# Altium PCB PCB4270Y_A00.PcbDoc (part 2 of 4)
Units mil, origin at the board's own origin, x right, y up, seen from the top; angles counter-clockwise.
Board outline 3622.05 x 2007.87 mil, 4 copper layers (Top Layer, Signal Layer 2, Signal Layer 3, Bottom Layer), stack 62.992 mil thick; 126 components, 105 nets, 457 pads, 1130 vias.
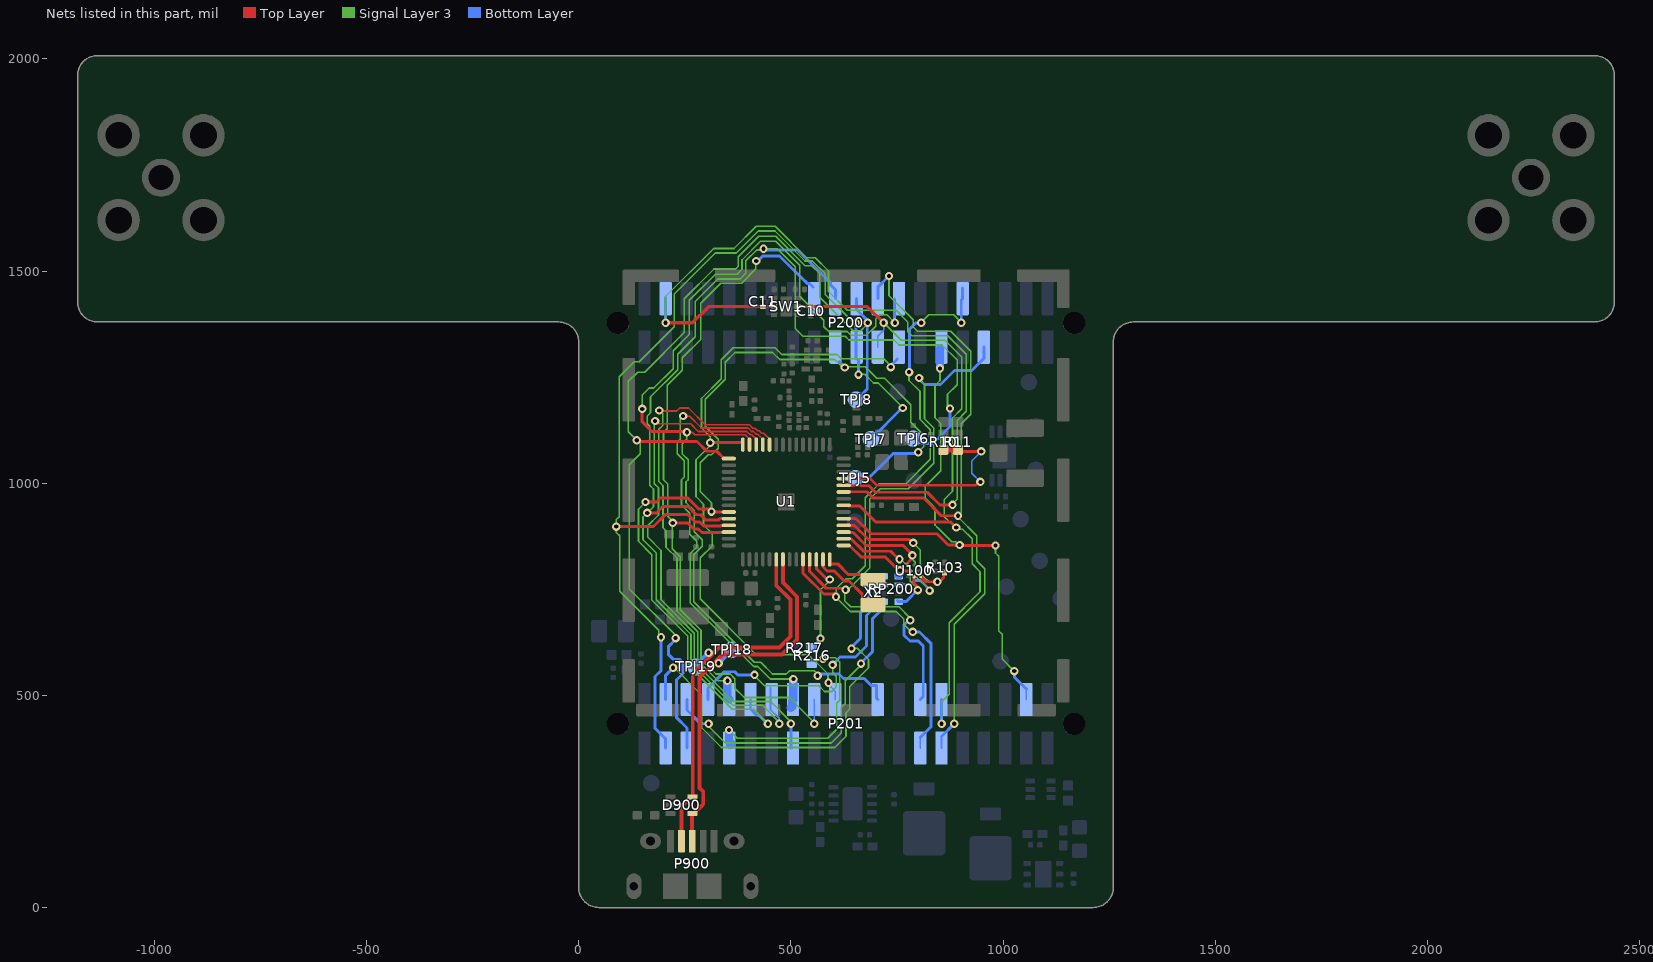
[diagram p4: the nets of this part, all layers, seen from the top]

## Via types
v1: diameter 19.68, hole 9.84, Top Layer to Bottom Layer, tented both sides, 1104 vias
v2: diameter 20, hole 9.84, Top Layer to Bottom Layer, tented both sides, 24 vias
v3: diameter 19.68/0/0/19.68 (per signal layer), hole 9.84, Top Layer to Bottom Layer, tented both sides, 2 vias

## Nets (pads, with @x,y where several pads share a name; then routed paths per layer and width w, separated by ;. In a path a pad name is that pad's centre, name@x,y a point inside that pad or via, vN(x,y) a via of type N, cw(c..) or ccw(c..) an arc to the next point about the centre after c; other vN are vias at no path point) (continued)
DISP_SI: P200.29 P201.38 U1.5 | length 1318.5
  Top Layer w6.89: U1.5@624.41,916.34 653.22,916.34 688.65,880.91 844.49,880.91 871.06,854.33 904.53,854.33 903.54,853.35 v1(982.28,853.35) ; v2(897.68,854.37) v2@904.49,854.37
  Signal Layer 3 w3.94: v1(851.38,1270.67) 851.38,1242.13 839.57,1230.31 839.57,1154.53 853.35,1140.75 853.35,1029.53 816.93,993.11 816.93,964.57 839.57,941.93 839.57,901.57 847.44,893.7 878.94,862.2 888.78,862.2 v2@896.65,854.33 ; v1(982.28,853.35) 982.28,835.63 990.16,827.76 990.16,651.57 998.03,643.7 998.03,585.63 v1(1026.57,557.09)
  Bottom Layer w3.94: P201.38@1054.92,490.16 P201.38@1054.92,514.96
  Bottom Layer w6.89: P200.29@851.38,1317.32 P200.29@854.92,1320.87 ; v1(1026.57,557.09) 1026.57,543.31 P201.38@1054.92,514.96
  Bottom Layer w19.68: v1(851.38,1270.67) P200.29@851.38,1317.32
EFR32_PA0: P200.22 P201.5 TPJ8.1 U1.29 | length 2368.1
  Top Layer w6.89: v1@138.78,1098.43 278.55,1098.43 301.68,1075.3 325.3,1075.3 342.52,1058.07 U1.29@353.94,1058.07
  Signal Layer 3 w3.94: v1(136.81,1101.38) 117.13,1121.06 117.13,1240.16 138.78,1261.81 155.51,1261.81 249.02,1355.32 249.02,1435.04 318.9,1504.92 370.22,1504.92 375.98,1510.69 375.98,1533.46 424.21,1581.69 464.26,1581.69 533.16,1512.8 549.21,1512.8 567.91,1494.09 567.91,1437.99 646.65,1359.25 664.37,1359.25 678.15,1373.03 v1@678.15,1380.91 ; v1@140.75,1100.39 144.69,1096.46 144.69,1069.07 119.09,1043.48 119.09,859.25 119.09,750.87 v1@233.25,636.72
  Bottom Layer w6.89: v1@228.35,631.89 211.13,614.68 211.13,596.99 222.95,585.17 237.67,585.17 245.57,577.26 245.57,551.67 230.31,536.42 ; 230.17,536.56 230.02,536.42 230.02,448.21 254.92,423.31 P201.5@254.92,375.98 ; P200.22@654.92,1435.04 654.92,1409.05 681.1,1382.87 v1@681.1,1380.74 ; TPJ8.1@656.5,1198.82 680.02,1222.34 680.02,1381.82 v1@681.1,1380.74 ; v1(681.1,1377.95) v1@681.1,1380.74
  other v1: 228.35,634.84
EFR32_PA8: P200.19 P201.12 TPJ5.1 U1.37 | length 2218.5
  Top Layer w6.89: v1(157.48,955.71) 183.07,955.71 192.47,965.11 257.22,965.11 282.81,939.52 313.98,939.52 313.98,933.07 v1@312.05,931.15 ; 322.85,932.09 329.72,932.09 U1.37@353.94,932.09
  Signal Layer 3 w3.94: v1(157.48,955.71) 140.75,938.98 140.75,863.19 172.24,831.69 172.24,724.72 256.89,640.07 256.89,572.24 361.86,467.27 412.65,467.27 446.85,433.07 v1(445.87,433.07) ; v1@312.99,931.1 312.99,953.74 286.42,980.32 286.42,1048.23 305.12,1066.93 312.99,1066.93 328.74,1082.68 328.74,1103.35 298.23,1133.86 298.23,1197.53 345.47,1244.77 345.47,1285.21 368.33,1308.07 456.69,1308.07 473.43,1291.34 603.78,1291.34 622.42,1272.7 v1(626.91,1272.7) 626.05,1272.7 627.95,1274.61 675.2,1274.61 702.76,1247.05 720.47,1247.05 782.48,1185.04 782.48,1143.5 812.99,1112.99 812.99,1086.47 800.2,1073.68 v1(800.2,1072.83)
  Bottom Layer w3.94: P201.12@404.92,468.11 P201.12@404.92,490.16 ; v1(626.91,1272.7) v1@627.4,1273.19
  Bottom Layer w6.89: P201.12@404.92,468.11 419.78,453.25 424.7,453.25 v1@444.87,433.07 ; P200.19@614.17,1286.42 v1@627.4,1273.19 ; TPJ5.1@651.58,1011.81 683.07,1011.81 741.65,1070.39 797.75,1070.39 v1(800.2,1072.83)
  other v1: 312.99,933.07
EFR32_PA9: P200.20 P201.14 TPJ6.1 U1.38 | length 2940.6
  Top Layer w6.89: v1(161.42,930.12) 183.07,930.12 197.83,944.88 257.96,944.88 277.1,925.74 287.41,925.74 300.25,912.89 329.16,912.89 332.61,916.34 U1.38@353.94,916.34
  Signal Layer 3 w3.94: v1@476.38,432.09 476.38,433.07 432.95,476.5 363.77,476.5 264.76,575.51 264.76,643.33 183.07,725.03 183.07,835.63 151.57,867.13 151.57,920.28 v1(161.42,930.12) 176.18,944.88 176.18,986.22 167.32,995.08 167.32,1134.23 161.42,1140.13 161.42,1158.46 169.29,1166.34 169.29,1203.74 233.27,1267.72 233.27,1304.13 274.61,1345.47 274.61,1428.15 327.76,1481.3 380.39,1481.3 393.7,1494.61 393.7,1523.93 419.41,1549.64 432.57,1549.64 v1(435.59,1552.66) 468.01,1552.66 510.24,1510.43 510.24,1364.76 528.54,1346.46 627.95,1346.46 636.81,1337.6 743.11,1337.6 754.92,1325.79 856.3,1325.79 891.73,1290.35 891.73,1232.28 869.09,1209.65 869.09,1178.15 870.57,1176.67 875,1181.1 v1(875,1176.18)
  Bottom Layer w3.94: P201.14@451.97,517.72 451.97,466.34 472.44,445.87 v1(472.44,433.07)
  Bottom Layer w6.89: v1(435.59,1552.66) 435.59,1550.69 437.06,1549.21 516.73,1549.21 593.5,1472.44 593.5,1467.52 604.92,1456.1 P200.20@604.92,1435.04 ; TPJ6.1@788.19,1105.12 796.98,1105.12 808.59,1093.5 834.65,1093.5 875,1133.86 v1(875,1176.18)
EFR32_PA10: P200.21 P201.3 TPJ7.1 U1.39 | length 2454.2
  Top Layer w6.89: v1@88.58,895.67 90.55,897.64 176.18,897.64 205.26,926.72 256.63,926.72 274.89,908.46 285.2,908.46 294.55,899.11 334.87,899.11 335.26,899.51 335.33,899.51 336.52,900.69 336.61,900.59 U1.39@353.94,900.59
  Signal Layer 3 w3.94: v1@194.63,642.97 192.18,642.97 188.98,639.76 188.98,653.23 96.46,745.75 96.46,876.03 88.58,883.91 v1(88.58,897.64) 88.58,914.37 95.47,921.26 95.47,1250.98 130.91,1286.42 142.72,1286.42 225.39,1369.09 225.39,1445.87 321.85,1542.32 371.06,1542.32 423.23,1594.49 462.6,1594.49 533.46,1523.62 550.33,1523.62 580.71,1493.24 580.71,1444.88 646.65,1378.94 v1@651.57,1378.94 ; v1@658.46,1256.89 674.21,1256.89 694.88,1236.22 705.71,1236.22 759.84,1182.09 759.84,1177.17 v1@761.81,1175.2
  Bottom Layer w6.89: v1(193.9,636.81) 193.9,558.07 180.02,544.19 180.02,422.34 204.92,397.44 P201.3@204.92,375.98 ; v1@653.54,1374.02 653.54,1295.28 659.45,1289.37 v1@659.45,1258.86 ; TPJ7.1@688.58,1103.54 762.2,1177.17 v1(763.78,1177.17)
  other v1: 659.45,1255.91 653.54,1377.95
EFR32_PA11: P200.18 P201.18 U1.40 | length 1810
  Top Layer w6.89: v1(221.46,906.5) 256.89,906.5 271.65,891.73 282.44,891.73 290.32,883.86 354.33,883.86 U1.40@355.31,884.84
  Signal Layer 3 w3.94: v1(221.46,906.5) 220.47,905.51 220.47,845.78 239.41,826.84 239.41,702.09 288.39,653.12 288.39,585.29 323.48,550.2 356.92,550.2 368.11,539 368.11,516.73 389.89,494.96 496.19,494.96 555.12,436.02 v1(555.12,433.07) ; v1@226.87,905.02 209.65,922.24 209.65,998.03 199.8,1007.87 199.8,1119.09 208.66,1127.95 208.66,1230.62 244.09,1266.06 244.09,1295.28 287.4,1338.58 287.4,1424.21 334.65,1471.46 383.86,1471.46 417.52,1505.12 417.52,1522.84 v1(418.31,1523.62)
  Bottom Layer w3.94: v1@554.92,436.22 P201.18@554.92,490.16
  Bottom Layer w6.89: v1(418.31,1523.62) 421.77,1523.62 433.58,1535.43 473.43,1535.43 532.97,1475.89 533.71,1475.89 538.63,1470.97 543.8,1470.97 P200.18@552.17,1462.6
EFR32_PB00: P200.25 P201.20 U1.28 | length 1608.1
  Top Layer w3.94: U1.28@386.81,1090.94 U1.28@386.81,1095.47
  Top Layer w6.89: v1(310.04,1095.47) U1.28@386.81,1095.47
  Signal Layer 3 w3.94: v1@587.6,529.53 587.6,550.2 541.31,596.48 417.49,596.48 286.66,727.32 286.66,824.48 314.35,852.18 314.35,881.52 294.29,901.57 294.29,950.79 276.57,968.5 276.57,1055.28 310.04,1088.75 v1(310.04,1095.47) 310.04,1109.57 289.37,1130.24 289.37,1199.8 335.63,1246.06 335.63,1290.68 363.85,1318.9 462.6,1318.9 478.35,1303.15 609.25,1303.15 619.09,1293.31 718.5,1293.31 739.17,1272.64 v1@739.17,1266.73
  Bottom Layer w3.94: P201.20@594.49,519.69 604.92,509.25 P201.20@604.92,490.16
  Bottom Layer w6.89: v1(735.27,1273.68) 735.27,1274.57 734.25,1275.59 750,1291.34 P200.25@750,1292.32
  other v1: 588.58,529.53
EFR32_PB01: P200.26 P201.24 U1.27 | length 2414.7
  Top Layer w3.94: v1@255.89,1121.08 251.97,1125 249.02,1122.05 250.93,1120.13 v1(254.94,1120.13) 267.66,1120.13 273.62,1114.17 392.72,1114.17 402.56,1104.33 U1.27@402.56,1090.94
  Top Layer w6.89: v1@148.62,1175.2 149.61,1174.21 149.61,1144.62 172.18,1122.05 v1@249.02,1122.05
  Signal Layer 3 w3.94: v1(149.62,1175.25) 149.62,1207.69 166.34,1224.41 177.17,1224.41 222.44,1269.69 222.44,1312.01 260.83,1350.39 260.83,1431.1 322.34,1492.62 373.52,1492.62 384.84,1503.94 384.84,1526.21 428.52,1569.88 464.57,1569.88 521.06,1513.39 521.06,1440.55 577.76,1383.86 577.76,1369.09 589.4,1357.45 632.71,1357.45 641.73,1348.43 678.15,1348.43 699.8,1370.08 699.8,1386.81 709.65,1396.65 726.38,1396.65 742.98,1380.05 v1@742.98,1377.1 ; v1(254.94,1120.13) 254.94,1103.36 244.09,1092.52 244.09,1069.02 257.87,1055.24 257.87,1007.87 252.95,1002.95 252.95,954.72 272.64,935.04 272.64,885.83 291.34,867.13 291.34,851.44 270.91,831 270.91,720.79 413.95,577.76 429.13,577.76 456.69,550.2 489.17,550.2 497.05,558.07 555.12,558.07 563.02,550.17 v1(563.02,546.29)
  Bottom Layer w6.89: v1@562.98,548.23 564.95,550.2 613.4,550.2 623.73,539.86 672.74,539.86 689.47,523.13 701.77,523.13 701.77,493.31 P201.24@704.92,490.16 ; v1@744.1,1380.91 P200.26@744.1,1434.06
  other v1: 745.08,1377.95
EFR32_PB02: P201.15 U1.26 | length 1243.4
  Top Layer w3.94: v1(180.12,1146.65) 187.01,1139.76 263.78,1139.76 281.5,1122.05 395.98,1122.05 403.89,1114.13 408.51,1114.13 410.43,1112.2 418.31,1104.33 U1.26@418.31,1090.94
  Signal Layer 3 w3.94: v1@178.15,1144.69 178.15,999.02 187.99,989.17 187.99,925.2 162.4,899.61 162.4,873.03 193.9,841.54 193.9,725.34 272.64,646.6 272.64,578.77 365.68,485.73 453.74,485.73 ; 453.74,484.25 500,437.99 v1(500,433.07)
  Bottom Layer w6.89: P201.15@500,375.98 v1@500,434.05
EFR32_PB03: P201.16 U1.25 | length 1087.2
  Top Layer w3.94: v1@247.05,1157.48 261.81,1157.48 289.37,1129.92 399.24,1129.92 407.16,1122 411.77,1122 418.31,1115.47 421.94,1115.47 427.17,1110.24 434.06,1103.35 U1.25@434.06,1090.94
  Signal Layer 3 w3.94: 239.17,1103.35 232.28,1096.46 232.28,1069.7 249.02,1052.97 249.02,1014.76 242.13,1007.87 242.13,948.82 261.81,929.13 261.81,879.92 278.54,863.19 278.54,849.78 263.03,834.27 263.03,717.53 412.65,567.91 422.24,567.91 451.76,538.39 v1(505.91,538.39) ; 239.19,1103.35 239.19,1113.61 239.19,1151.59 v1(246.06,1158.46)
  Bottom Layer w19.68: P201.16@500,470.47 502.95,473.43 502.95,486.22 505.91,489.17 v1(505.91,538.39)
EFR32_PB04: P201.10 U1.24 | length 1064.9
  Top Layer w3.94: v1@192.91,1170.28 231.3,1170.28 238.19,1177.17 258.86,1177.17 298.23,1137.8 402.5,1137.8 410.42,1129.88 415.03,1129.88 421.57,1123.34 425.2,1123.34 430.76,1117.77 436.36,1117.77 445.87,1108.27 448.82,1105.31 448.82,1090.94 U1.24@449.8,1090.94
  Signal Layer 3 w3.94: 197.83,1165.35 197.83,1135.83 188.98,1126.97 188.98,1003.94 198.82,994.09 198.82,894.69 205.71,887.8 205.71,849.41 231.54,823.58 231.54,698.83 280.51,649.86 280.51,582.03 328.09,534.45 v1(350.39,534.45)
  Bottom Layer w3.94: P201.10@354.92,490.16 P201.10@355.31,490.55
  Bottom Layer w19.68: v1(350.39,534.45) 350.39,495.47 P201.10@355.31,490.55
  other v1: 189.96,1171.26
EFR32_PC00: RP200.1 U1.1 U100.D2 | length 195.7
  Top Layer w3.94: v2@755.89,793.33 v2@756.85,794.29
  Top Layer w6.89: U1.1@624.41,853.35 638.26,853.35 665.82,825.79 722.44,825.79 750.96,797.26 v2@755.89,797.26 ; v2@755.91,792.32 755.91,793.31 U100.D2@782.48,793.31
  Bottom Layer w19.68: RP200.1@753.94,783.46 756.89,786.42 v2(756.89,794.29)
EFR32_PC01: RP200.4 U1.2 U100.C3 | length 345.3
  Top Layer w6.89: U1.2@624.41,869.09 642,869.09 671.53,839.57 735.24,839.57 749.02,825.79 v1@756.89,825.79 ; U100.C3@790.35,779.53 790.35,764.76 v2@802.17,752.95
  Signal Layer 3 w3.94: v1@753.94,825.79 768.87,810.86 781.5,798.23 781.5,768.82 802.17,748.15 801.22,747.21 800.4,748.03 v2(799.21,748.03)
  Bottom Layer w6.89: RP200.4@750.98,723.43 752.95,721.46 771.66,721.46 798.24,748.03 v2(799.21,748.03) v2@800.69,746.56
  other v1: 755.91,820.87
EFR32_PC02: RP200.2 U1.3 U100.E1 | length 404.2
  Top Layer w6.89: U1.3@624.41,884.84 624.41,883.76 646.82,883.76 677.24,853.35 764.76,853.35 787.4,830.71 v2@788.39,830.71 ; U100.E1@774.61,807.09 774.61,812.01 v2@787.4,824.8
  Signal Layer 3 w3.94: v2@782.05,825.36 793.31,814.1 793.31,781.5 v2@827.76,747.05 ; v2(826.77,747.05) v2@827.76,747.05 ; v2@827.76,747.05 829.72,745.08 830.71,746.06 829.72,747.05 v2@827.76,747.05
  Bottom Layer w6.89: RP200.2@753.94,761.81 754.92,760.83 781.5,760.83 791.34,770.67 805.33,770.67 826.77,749.23 v2(826.77,747.05)
  other v2: 786.42,829.72
EFR32_PC03: R103.1 U1.4 U100.A3 | length 387.6
  Top Layer w6.89: U1.4@624.41,900.59 649.48,900.59 682.94,867.13 779.53,867.13 788.42,858.23 v2(788.42,859.29) ; U100.A3@807.09,778.54 817.91,767.72 848.43,767.72 v2@849.41,767.72 ; v2(845.51,767.75) 850.43,767.75 860.24,777.56 R103.1@860.24,789.37
  Signal Layer 3 w3.94: v2(788.42,859.29) 805.22,842.42 805.22,787.08 814.56,777.73 823.71,768.59 823.82,768.7 824.77,767.75 v2(845.51,767.75)
EFR32_PC06: C10.1 P200.23 P201.30 SW1.5 U1.7 | length 1796.5
  Top Layer w6.89: U1.7@624.41,947.83 U1.7@635.83,947.83 ; U1.7@635.83,946.75 661.78,946.75 700.07,908.46 877.06,908.46 v1(889.81,895.71)
  Top Layer w7.87: SW1.5@517.72,1416.34 C10.1@546.26,1416.34 680.12,1416.34 v1(718.5,1377.95)
  Signal Layer 3 w3.94: v1(718.5,1377.95) 759.84,1336.61 863.19,1336.61 902.56,1297.24 902.56,1175.2 880.91,1153.54 880.91,981.3 861.22,961.61 861.22,921.26 886.77,895.71 v1(889.81,895.71) ; v1(855.31,433.07) 855.31,485.24 873.03,502.95 873.03,671.26 945.87,744.09 945.87,791.34 927.17,810.04 927.17,869.09 904.53,891.73 v1@891.73,891.73
  Bottom Layer w3.94: P200.23@704.92,1320.87 704.92,1346.65 718.5,1360.24 v1@718.5,1375.98
  Bottom Layer w6.89: v1@854.92,433.46 P201.30@854.92,490.16
EFR32_PC07: P200.24 P201.29 U1.9 | length 1676.9
  Top Layer w6.89: U1.9@624.41,979.33 624.95,979.87 678.89,979.87 693.9,964.86 812.7,964.86 854.33,923.23 v1(893.7,923.23)
  Signal Layer 3 w3.94: v1(731.34,1488.26) 731.34,1441.93 788.39,1384.88 788.39,1368.11 798.23,1358.27 876.97,1358.27 924.21,1311.02 924.21,1162.4 901.57,1139.76 v1@901.57,923.23 ; v1(884.89,433.09) 884.89,667.37 956.69,739.17 956.69,798.23 937.99,816.93 937.99,875.98 893.7,920.28 893.7,922.24 v1@894.19,922.74 ; v1(893.7,923.23) v1@897.64,927.17
  Bottom Layer w3.94: P201.29@854.92,375.98 P201.29@854.92,403.13
  Bottom Layer w6.89: P200.24@704.92,1435.04 704.92,1461.81 v1@730.31,1487.2 ; P201.29@854.92,403.13 v1(884.89,433.09)
EFR32_PC08: C11.1 P200.4 SW1.2 U1.10 | length 1973
  Top Layer w6.89: U1.10@624.41,995.08 625.49,994 684.25,994 699.61,978.64 821.56,978.64 851.38,948.82 v2(880.91,948.82)
  Top Layer w7.87: v2(204.72,1377.95) 267.72,1377.95 306.1,1416.34 C11.1@434.06,1416.34 SW1.2@460.63,1416.34
  Signal Layer 3 w3.94: v2@204.72,1378.94 204.72,1439.96 317.91,1553.15 366.14,1553.15 418.31,1605.32 462.91,1605.32 536.73,1531.5 557.09,1531.5 588.58,1500 588.58,1451.77 632.87,1407.48 748.03,1407.48 775.59,1379.92 775.59,1357.28 785.43,1347.44 870.08,1347.44 913.39,1304.13 913.39,1169.29 891.73,1147.64 891.73,962.62 880.91,951.79 v2(880.91,948.82)
  Bottom Layer w6.89: v2@204.92,1382.68 P200.4@204.92,1435.04
EFR32_PC09: R10.2 R11.2 U1.11 | length 513.2
  Top Layer w3.94: R11.2@893.7,1078.74 R11.2@897.64,1074.8 ; v2@942.5,1002.95 v2(946.85,1002.95)
  Top Layer w6: U1.11@624.41,1010.83 687.01,1010.83 702.76,995.08 934.63,995.08 v2@942.5,1002.95
  Top Layer w7: R11.2@897.64,1074.8 v2(948.82,1074.8)
  Top Layer w11.81: R10.2@859.26,1078.74 R11.2@893.7,1078.74
  Bottom Layer w3.94: v2(946.85,1002.95) 926.18,1023.62 926.18,1052.17 v2(948.82,1074.8)
EFR32_PD00: U1.56 X2.1 | length 100.2
  Top Layer w6.89: U1.56@591.54,810.04 610.24,810.04 635.83,784.45 X2.1@681.1,784.45
EFR32_PD01: U1.55 X2.2 | length 182.2
  Top Layer w6.89: U1.55@576.5,819.76 U1.55@575.79,820.47 575.79,802.88 585.46,793.21 602.36,793.21 625.89,769.69 636.81,769.69 668.31,738.19 668.31,716.54 X2.2@690.94,716.54
EFR32_PD02: R216.2 R217.1 U1.54 | length 253.8
  Top Layer w6.89: U1.54@560.04,820.47 560.04,799.14 586.53,772.66 586.9,773.03 v1(591.54,773.03)
  Signal Layer 3 w3.94: v1@567.91,636.81 569.88,638.78 569.88,749.02 593.94,773.07 v1@593.94,780.07
  Bottom Layer w6.89: R217.1@557.09,603.35 557.09,621.06 v1(569.88,633.86)
EFR32_PD03: P200.33 P201.28 U1.53 | length 1416.8
  Top Layer w6.89: U1.53@544.29,820.47 544.29,791.74 583.54,752.5 623.49,752.5 v1@625.98,750
  Signal Layer 3 w3.94: v1(628.94,749.02) v1@630.91,749.02 ; v1(781.5,677.17) 781.5,682.09 754.92,708.66 640.75,708.66 626.97,722.44 626.97,752.95 v1@630.91,749.02 ; v1(802.17,1248.03) 802.17,1244.09 814.96,1231.3 814.96,1151.57 836.61,1129.92 836.61,1047.24 776.57,987.2 710.63,987.2 686.02,962.6 686.02,800.2 632.87,747.05 v1@630.91,749.02
  Bottom Layer w6.89: v1@778.54,674.21 774.61,674.21 766.73,666.34 766.73,641.74 780.52,627.95 800.2,627.95 812.01,616.14 812.01,497.24 P201.28@804.92,490.16 ; v1@802.17,1243.11 804.13,1243.11 814.96,1232.28 852.36,1232.28 885.83,1265.75 926.18,1265.75 954.92,1294.49 P200.33@954.92,1320.87
EFR32_PD04: P200.32 P201.27 U1.52 | length 1670.9
  Top Layer w6.89: U1.52@528.54,820.47 528.54,788 577.84,738.7 v1@606.3,738.7
  Signal Layer 3 w3.94: v1@607.28,739.69 607.28,751.97 629.92,774.61 644.68,774.61 675.2,805.12 675.2,965.55 707.68,998.03 770.67,998.03 828.74,1056.1 828.74,1125.98 804.13,1150.59 804.13,1216.54 778.58,1242.09 v1(778.58,1261.87) ; v1@608.27,735.24 608.27,729.33 639.76,697.83 748.03,697.83 765.75,680.12 765.75,667.32 783.46,649.61 v1(787.4,649.61) ; v2@807.09,1378.94 824.8,1396.65 883.86,1396.65 901.57,1378.94 v2(901.57,1377.95)
  Bottom Layer w3.94: P201.27@804.92,375.98 P201.27@804.92,400.39
  Bottom Layer w6.89: v1@779.53,1263.78 779.82,1264.08 779.82,1362.61 795.16,1377.95 v2(807.09,1377.95) ; v1(787.4,649.61) 803.15,649.61 829.82,622.93 829.82,425.3 P201.27@804.92,400.39 ; v2@904.53,1381.89 901.57,1384.84 901.57,1431.69 P200.32@904.92,1435.04 P200.32@904.92,1460.24
  other v1: 606.3,732.28
EFR32_PD06: D900.4 P900.3 TPJ18.1 U1.49 | length 944.4
  Top Layer w8.66: 481.3,798.23 U1.49@481.3,820.47
  Top Layer w9.06: P900.3@269.49,163.39 266.73,166.14 266.73,216.54 D900.4@269.68,219.49 ; 481.38,801.27 481.38,765.66 514.76,732.28 514.76,631.89 479.33,596.46 338.58,596.46 284.86,542.73 284.86,282.07 293.41,273.52 293.41,243.21 289.57,239.37 ; D900.4@269.68,219.49 D900.4@273.62,223.43 ; D900.4@269.68,219.49 D900.4@273.62,223.43 ; D900.4@273.62,223.43 289.57,239.37 ; D900.4@273.62,223.43 289.57,239.37
  Bottom Layer w9.06: v3(329.72,575.79) 330.71,575.79 359.25,604.33 TPJ18.1@359.25,606.3 ; TPJ18.1@360.24,607.09 TPJ18.1@364.17,603.15
EFR32_PD07: D900.5 P900.2 TPJ19.1 U1.48 | length 926.1
  Top Layer w8.66: 465.55,792.32 465.55,800.68 U1.48@465.55,820.47
  Top Layer w9.06: P900.2@243.9,163.39 242.13,165.16 242.13,238.19 264.76,260.83 272.64,260.83 D900.5@273.62,261.81 ; D900.5@274.61,260.83 D900.5@273.62,261.81 ; 465.44,800.68 465.44,792.32 465.44,759.06 498.82,725.68 498.82,638.58 473.43,613.19 330.71,613.19 268.91,551.39 268.91,261.6 271.16,259.35 D900.5@273.62,261.81
  Bottom Layer w9.06: TPJ19.1@276.57,571.85 305.12,600.39 v3(306.1,600.39)
EXP_HEADER4: P201.4 RP200.8 | length 1097.2
  Signal Layer 3 w3.94: v1(222.45,564.99) 222.45,569.87 222.44,567.91 289.37,500.98 289.37,424.21 336.61,376.97 603.35,376.97 629.92,403.54 629.92,458.86 638.78,467.72 638.78,520.8 683.07,565.09 683.07,584.65 656.5,611.22 v1@647.64,611.22
  Bottom Layer w6.89: P201.4@204.92,490.16 204.92,547.44 v1@224.41,566.93 ; v1(642.75,610.27) 643.7,611.22 643.7,614.1 v1@645.7,616.11 ; v1@645.67,616.14 664.37,634.84 664.37,694.88 684.06,714.57 684.06,764.76 699.8,780.51 716.54,780.51 RP200.8@718.5,782.48
EXP_HEADER6: P201.6 RP200.5 | length 784.8
  Signal Layer 3 w3.94: v1@308.07,435.04 308.07,425.2 345.47,387.8 595.47,387.8 619.09,411.42 619.09,471.46 627.95,480.32 627.95,534.45 664.37,570.87 v1@664.37,574.8
  Bottom Layer w6.89: P201.6@254.92,490.16 254.92,465.55 287.4,433.07 ; 287.42,433.09 v1(306.12,433.09) ; v1@664.37,574.8 691.93,602.36 691.93,680.12 716.54,704.72 RP200.5@716.54,720.47
  other v1: 665.35,574.8
EXP_HEADER8: P201.8 RP200.7 | length 697.2
  Signal Layer 3 w3.94: v1@416.34,545.28 417.64,543.98 417.64,542.99 437.99,522.64 565.94,522.64 579.33,509.25 596.85,509.25 607.28,519.69 607.28,545.28 598.43,554.13 v1(598.43,571.85)
  Signal Layer 3 w6.89: v1@412.4,548.23 v1(414.37,548.23)
  Bottom Layer w6.89: P201.8@304.92,490.16 304.92,517.51 343.02,555.61 367.62,555.61 375,548.23 v1(414.37,548.23) ; v1@595.96,569.39 597.93,569.39 601.38,572.83 601.38,575.79 615.68,590.09 652.09,590.09 652.56,590.55 678.15,616.14 678.15,687.99 698.33,708.17 698.33,753.44 704.72,759.84 715.55,759.84 RP200.7@718.5,762.8
EXP_HEADER9: P201.9 R216.1 | length 551.1
  Signal Layer 3 w3.94: v1(354.33,418.31) 374.02,398.62 586.61,398.62 608.27,420.28 608.27,481.3 615.16,488.19 615.16,578.74 605.31,588.58 578.74,588.58 v1(575.82,585.66) v1@581.72,585.66
  Bottom Layer w6.89: R216.1@546.26,583.66 574.57,583.66 575.82,584.91 v1(575.82,585.66)
  Bottom Layer w19.68: v1(354.33,418.31) 354.33,390.79 359.27,385.85 P201.9@357.28,383.86